# Altium PCB 24V-70A-Power-Board-v2.0.PcbDoc (part 4 of 9)
Units mm, origin at the board's own origin, x right, y up, seen from the top; angles counter-clockwise.
Board outline 350 x 215 mm, 2 copper layers (Top Layer, Bottom Layer), stack 1.64 mm thick; 337 components, 182 nets, 856 pads, 561 vias.
Unrouted connection lines stored in the file: 58.
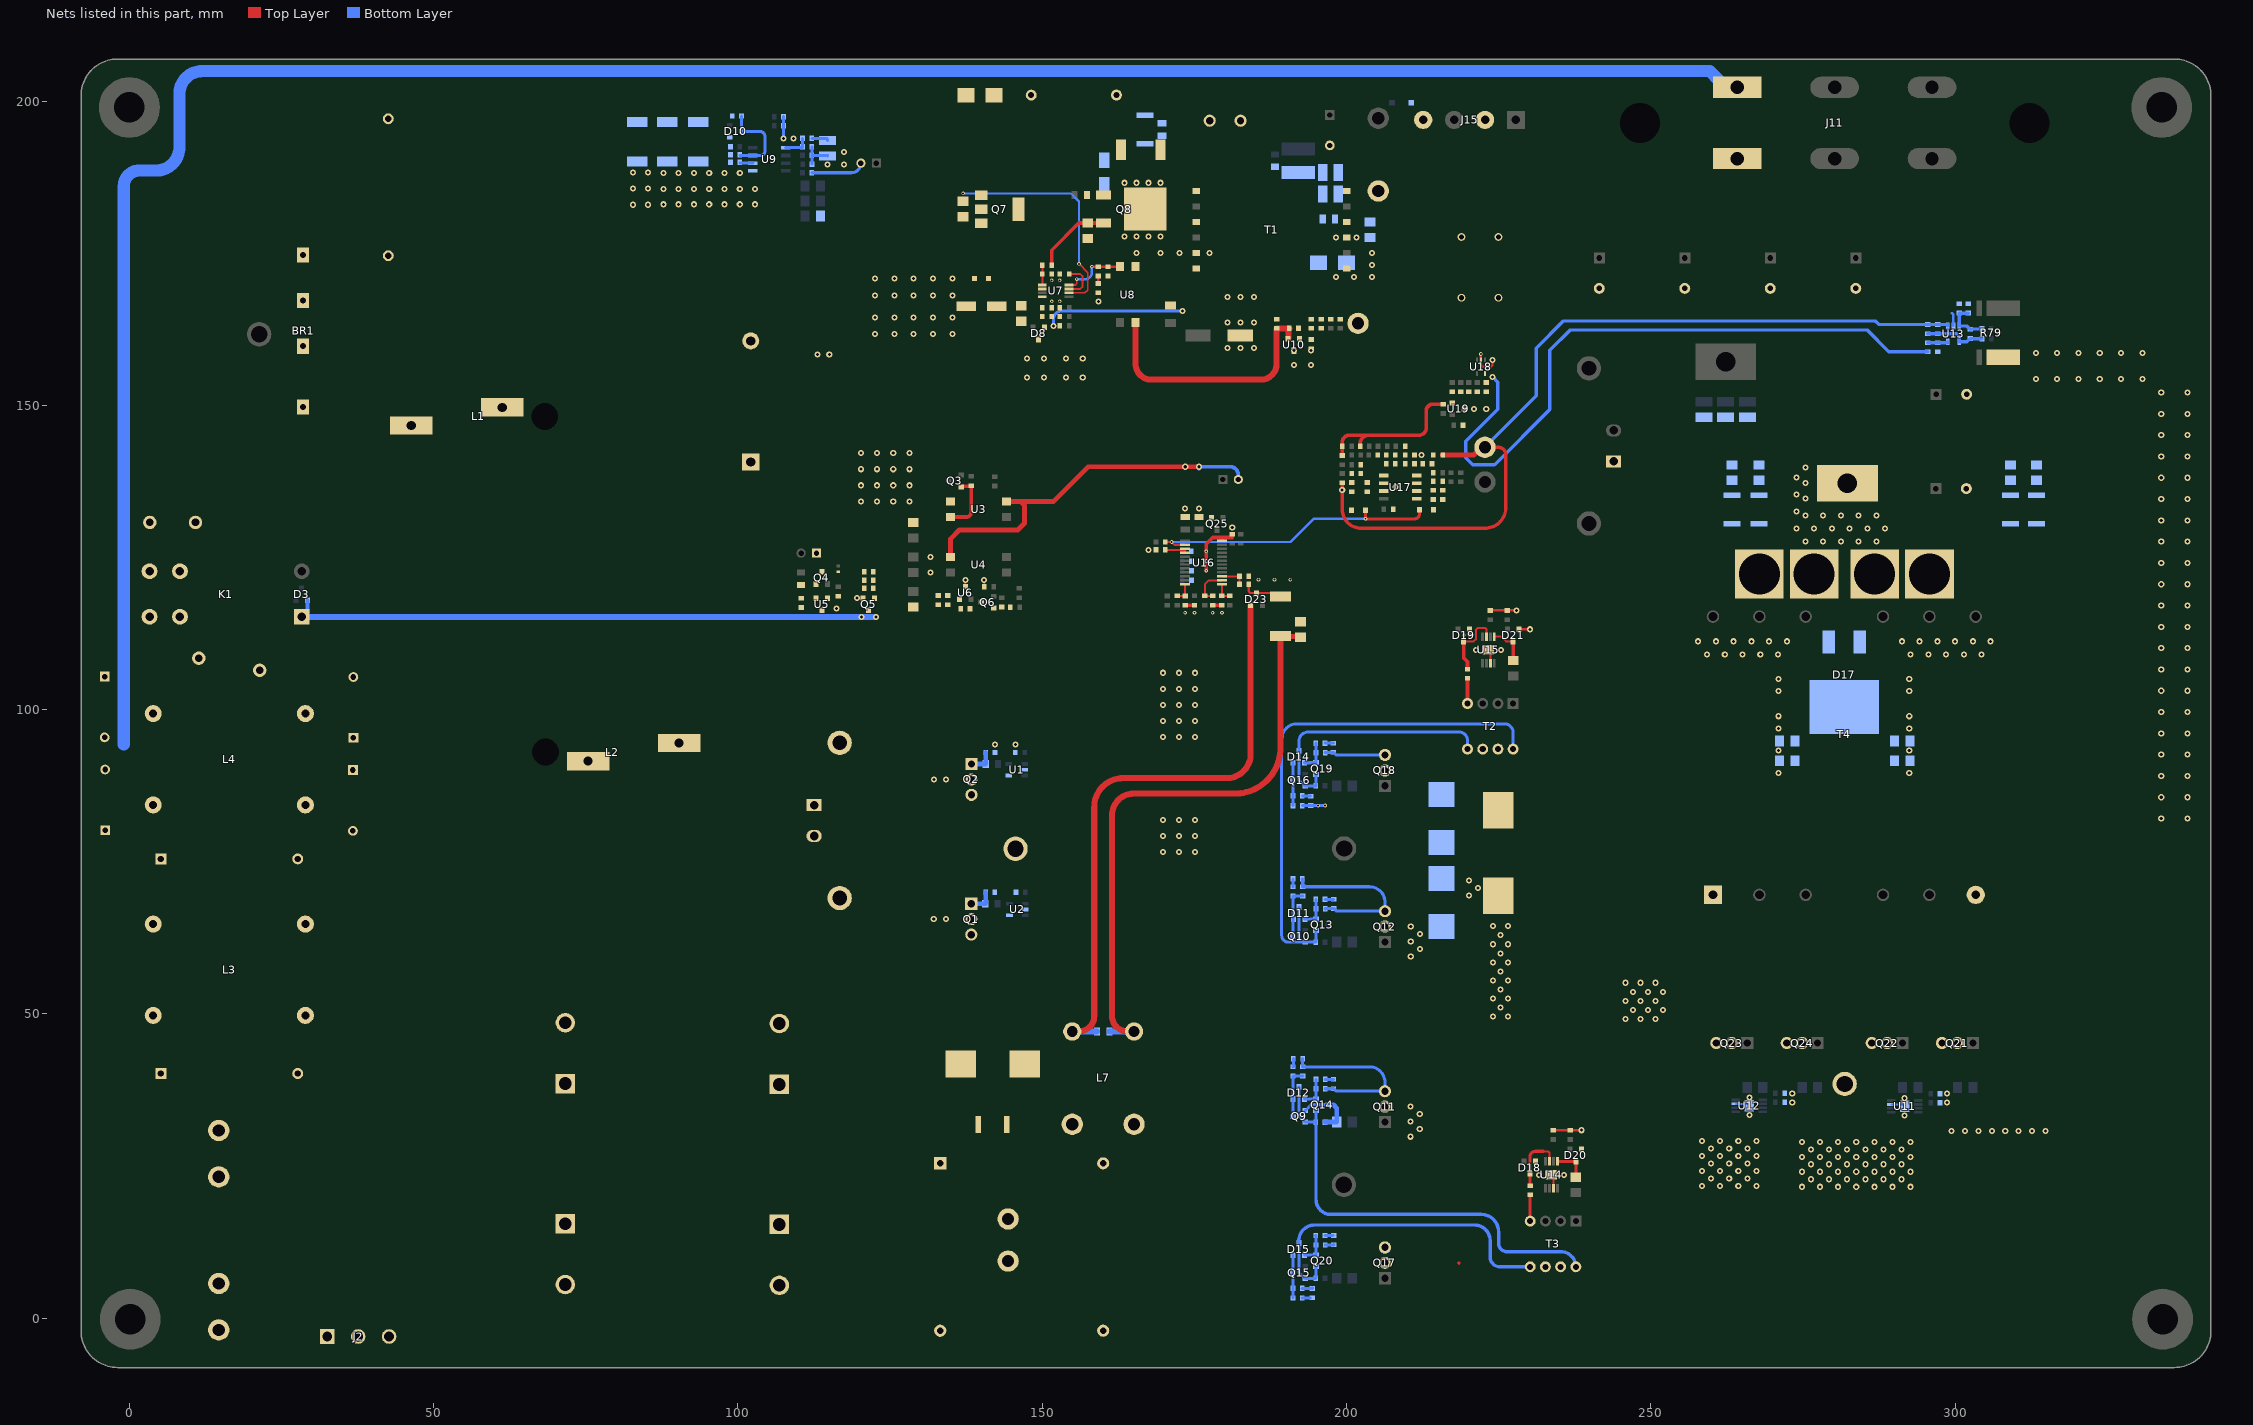
[diagram p2: the nets of this part, all layers, seen from the top]

## Part data (continued)
NT1: "Net Tie SMD", Manufacturer Part Number="Net Tie", Item Type="Net Tie Pad"
Q1 Q2: "MOSFET N-CH 650V 18A TO220-3", Manufacturer=Infineon, ComponentLink1Description=http://www.farnell.com/datasheets/1812585.pdf?src-supplier=Element14, ComponentLink1URL=http://www.farnell.com/datasheets/1812585.pdf?src-supplier=Element14, ComponentLink2Description=http://www.farnell.com/datasheets/1812585.pdf?src-supplier=Newark, ComponentLink2URL=http://www.farnell.com/datasheets/1812585.pdf?src-supplier=Newark, Item Type=Mosfet, Manufacturer Part Number=IPP65R125C7, Pricing="1=4.05, 10=3.4, 50=2.58, 100=2.35, 1000=1.88, 10000=1.88 (USD)", RoHS=Yes, Supplier=Mouser
Q3: "MOSFET P-CH 40V 2.3A SOT23-3", Drain to Source Breakdown Voltage=-40V, LCSC Part Number=C727531, Manufacturer="Vishay Siliconix", ComponentLink1Description=https://datasheet.ciiva.com/28599/1749956-28599616.pdf?src-supplier=Element14, ComponentLink1URL=https://datasheet.ciiva.com/28599/1749956-28599616.pdf?src-supplier=Element14, ComponentLink2Description=https://datasheet.ciiva.com/16486/72315-16486091.pdf?src-supplier=Future+Electronics, ComponentLink2URL=https://datasheet.ciiva.com/16486/72315-16486091.pdf?src-supplier=Future+Electronics, ComponentLink3Description=https://datasheet.ciiva.com/7788/72315-7788760.pdf?src-supplier=Element14, ComponentLink3URL=https://datasheet.ciiva.com/7788/72315-7788760.pdf?src-supplier=Element14, ComponentLink4Description=https://datasheet.ciiva.com/932/72315-932453.pdf?src-supplier=Digikey, ComponentLink4URL=https://datasheet.ciiva.com/932/72315-932453.pdf?src-supplier=Digikey, ComponentLink5Description=https://datasheet.ciiva.com/932/72315-932454.pdf?src-supplier=Digikey, ComponentLink5URL=https://datasheet.ciiva.com/932/72315-932454.pdf?src-supplier=Digikey, ComponentLink6Description=https://datasheet.ciiva.com/932/72315-932455.pdf?src-supplier=Digikey, ComponentLink6URL=https://datasheet.ciiva.com/932/72315-932455.pdf?src-supplier=Digikey, ComponentLink7Description=https://datasheet.ciiva.com/11161/72315-11161455.pdf?src-supplier=Avnet, ComponentLink7URL=https://datasheet.ciiva.com/11161/72315-11161455.pdf?src-supplier=Avnet, Item Type=MOSFETs, Lead Free=5697LeadFree, Manufacturer Part Number=SI2319DS-T1-E3, Pricing="1=0.55, 10=0.466, 50=0.466, 100=0.359, 1000=0.296, 10000=0.237 (USD)", RoHS=Yes, Stock=200176, Supplier=Mouser
Q4: "MOSFET P-CH 60V 1.6A SOT23-3", Case/Package=SOT-23-3, Continuous Drain Current (ID)=1.2A, Drain to Source Resistance=345mR, Drain to Source Voltage (Vdss)=60V, Gate to Source Voltage (Vgs)=20V, Input Capacitance=210pF, LCSC Part Number=C553975, Manufacturer="Vishay Siliconix", Max Operating Temperature=150°C, Max Power Dissipation=1.7W, Min Operating Temperature=-55°C, Package Quantity=3000, Power Dissipation=1W, Threshold Voltage=-1V, ComponentLink1Description=https://datasheet.ciiva.com/16217/si2309cd-16217597.pdf?src-supplier=Future+Electronics, ComponentLink1URL=https://datasheet.ciiva.com/16217/si2309cd-16217597.pdf?src-supplier=Future+Electronics, ComponentLink2Description=https://datasheet.ciiva.com/29742/si2309cd-29742879.pdf?src-supplier=Digikey, ComponentLink2URL=https://datasheet.ciiva.com/29742/si2309cd-29742879.pdf?src-supplier=Digikey, Drain-source On Resistance-Max=345mR, Fall Time=35ns, Height=1.02mm, Item Type=MOSFETs, Lead Free="Lead Free", Length=3.04mm, Manufacturer Part Number=SI2309CDS-T1-E3, Mounting Technology="Surface Mount", Number of Channels=1, Packaging="Tape and Reel", Pins=3, Polarity=P-CHANNEL, Pricing="1=0.53, 10=0.453, 50=0.453, 100=0.316, 1000=0.2, 10000=0.157 (USD)", Radiation Hardening=No, Rds On Max=345mR, Rise Time=35ns, RoHS=Yes, RoHS Compliant=Yes, Series=TrenchFET®, Stock=57582, Supplier=Mouser, Turn-Off Delay Time=15ns, Turn-On Delay Time=40ns, Weight=0.050717oz, Width=1.4mm
Q5 Q25: "50V 220mA 3.5Ω@10V,220mA 225mW 1.6V@1mA N Channel SOT-23 MOSFETs ROHS", LCSC Part Number=C426569, Manufacturer="Slkor(SLKORMICRO Elec.)", Package=SOT-23, ComponentLink1Description=LCSC, ComponentLink1URL=https://www.lcsc.com/product-detail/MOSFETs_Slkor-SLKORMICRO-Elec-BSS138_C426569.html, Item Type=Mosfet, Manufacturer Part Number=BSS138
Q6: "40V 300mW 200mA PNP SOT-23(TO-236) Bipolar Transistors - BJT ROHS", LCSC Part Number=C2891809, Manufacturer=YONGYUTAI, Package=SOT-23(TO-236), ComponentLink1Description=LCSC, ComponentLink1URL=https://www.lcsc.com/product-detail/Bipolar-Transistors-BJT_YONGYUTAI-MMBT3906_C2891809.html, Item Type=Transistor, Manufacturer Part Number=MMBT3906
Q7: "Trans MOSFET N-CH 600V 0.12A Automotive 4-Pin(3+Tab) SOT-223", LCSC Part Number=C3278599, Manufacturer=Infineon, Item Type=MOSFETs, Manufacturer Part Number=BSP135H6327XTSA1, Pricing="1=1.31, 10=1.08, 50=1.08, 100=0.837, 1000=0.577, 10000=0.563 (USD)", RoHS=Yes, Stock=85947, Supplier=Mouser
Q8: "650V 5A 950mΩ@10V 1 N-Channel TO-252 MOSFETs ROHS", LCSC Part Number=C20755211, Manufacturer="VBsemi Elec", Package=TO-252, ComponentLink1Description=LCSC, ComponentLink1URL=https://www.lcsc.com/product-detail/MOSFETs_VBsemi-Elec-FCD4N60TM-VB_C20755211.html, Item Type=MOSFETs, Manufacturer Part Number=FCD4N60TM-VB
Q9 Q10 Q15 Q16: "40V 200mW 100 200mA NPN SOT-23 Bipolar (BJT) ROHS", LCSC Part Number=C5249683, Manufacturer=ElecSuper, Package=SOT-23, ComponentLink1Description=LCSC, ComponentLink1URL=https://www.lcsc.com/product-detail/Bipolar-BJT_ElecSuper-MMBT3904_C5249683.html, Item Type=(BJT), Manufacturer Part Number=MMBT3904
Q11 Q12 Q17 Q18: "MOSFET N-CH 650V 14A TO220-3", LCSC Part Number=726-IPP65R190CFD, Manufacturer=Infineon, Max Dual Supply Voltage=650V, On-State Resistance=190mR, ComponentLink1Description=https://datasheet.ciiva.com/952/infineon-ipx65r190cfd-ds-v02-07-en-952136.pdf?src-supplier=Digikey, ComponentLink1URL=https://datasheet.ciiva.com/952/infineon-ipx65r190cfd-ds-v02-07-en-952136.pdf?src-supplier=Digikey, Item Type=MOSFETs, Lead Free=5697LeadFree, Manufacturer Part Number=IPP65R190CFDXKSA1, Pricing="1=3.7, 10=3.11, 50=2.93, 100=2.51, 1000=1.91, 10000=1.8 (USD)", RoHS=Yes, Stock=410, Supplier=Mouser
Q13 Q14 Q19 Q20: "TRANS PNP 40V 0.2A SOT23-3", Current Rating=-200mA, LCSC Part Number=C82762, Manufacturer="Diodes Zetex", Voltage Rating (DC)=-40V, ComponentLink1Description=https://datasheet.ciiva.com/27052/1540746-27052408.pdf?src-supplier=Jameco, ComponentLink1URL=https://datasheet.ciiva.com/27052/1540746-27052408.pdf?src-supplier=Jameco, ComponentLink2Description=https://datasheet.ciiva.com/15139/getdatasheetpartid-255292-15139821.pdf?src-supplier=Verical, ComponentLink2URL=https://datasheet.ciiva.com/15139/getdatasheetpartid-255292-15139821.pdf?src-supplier=Verical, Item Type=BJTs, Lead Free=5697LeadFree, Manufacturer Part Number=MMBT3906-7-F, Pricing="3000=0.0143, 12000=0.0137, 30000=0.0112, 45000=0.0131, 75000=0.0109, 120000=0.0128, 300000=0.0121 (USD)", RoHS=Yes, Stock=567000, Supplier="Future Electronics"
Q21 Q22 Q23 Q24: "MOSFET N-CH 200V 84A TO220-3", Case/Package=TO-220-3, LCSC Part Number=C537163, Manufacturer=Infineon, ComponentLink1Description=http://www.farnell.com/datasheets/1932551.pdf?src-supplier=Element14, ComponentLink1URL=http://www.farnell.com/datasheets/1932551.pdf?src-supplier=Element14, Halogen Free="Halogen Free", Item Type=MOSFETs, Lead Free="Lead Free", Manufacturer Part Number=IPP120N20NFD, Packaging=Rail/Tube, Pins=3, Pricing="50=2.03, 1000=2, 1500=1.98, 2000=1.97, 2500=1.93 (USD)", Reach SVHC Compliant=Yes, RoHS=Yes, RoHS Compliant=Yes, Stock=2450, Supplier="Future Electronics"
R1 R2 R29 R41: library part CRCW08052R21FKEA, "RES SMD 2.21 OHM 1% 1/8W 0805", LCSC Part Number=C2085884, Manufacturer="Vishay Dale", Voltage Rating (DC)=150V, ComponentLink1Description=https://datasheet.ciiva.com/9090/dcrcwe3-9090039.pdf?src-supplier=Avnet, ComponentLink1URL=https://datasheet.ciiva.com/9090/dcrcwe3-9090039.pdf?src-supplier=Avnet, ComponentLink2Description=https://datasheet.ciiva.com/5588/dcrcwe3-109170-5588315.pdf?src-supplier=Mouser, ComponentLink2URL=https://datasheet.ciiva.com/5588/dcrcwe3-109170-5588315.pdf?src-supplier=Mouser, ComponentLink3Description=https://datasheet.ciiva.com/2467/dcrcwe3-2467362.pdf?src-supplier=Digikey, ComponentLink3URL=https://datasheet.ciiva.com/2467/dcrcwe3-2467362.pdf?src-supplier=Digikey, ComponentLink4Description=https://datasheet.ciiva.com/2467/dcrcwe3-2467363.pdf?src-supplier=Digikey, ComponentLink4URL=https://datasheet.ciiva.com/2467/dcrcwe3-2467363.pdf?src-supplier=Digikey, ComponentLink5Description=https://datasheet.ciiva.com/2467/dcrcwe3-2467364.pdf?src-supplier=Digikey, ComponentLink5URL=https://datasheet.ciiva.com/2467/dcrcwe3-2467364.pdf?src-supplier=Digikey, Item Type=Resistor, Lead Free=5697LeadFree, Manufacturer Part Number=CRCW08052R21FKEA, Pricing="1=0.1, 10=0.033, 50=0.033, 100=0.02, 1000=0.015, 10000=0.01 (USD)", RoHS=Yes, Stock=740, Supplier=Mouser
R3 R4 R8 R13 R17 R38 R47 R86 R114 R119: library part RK73G1JTTD1002F, "RES 10K OHM 1% 1/10W 0603", Case Code (Imperial)=0603, Case Code (Metric)=1608, LCSC Part Number=C362180, Max Operating Temperature=125°C, Min Operating Temperature=-55°C, Power Rating=100mW, Supplier Part Number=2019-RK73G1JTTD1002FCT-ND, Temperature Coefficient=50ppm/°C, Tolerance=1%, Voltage Rating=75V, Case/Package=0603, Category="Chip SMD Resistors", ComponentLink1Description=LCSC, ComponentLink2Description=http://www.mouser.com/ds/2/219/RK73G-9863.pdf?src-supplier=Mouser, ComponentLink2URL=http://www.mouser.com/ds/2/219/RK73G-9863.pdf?src-supplier=Mouser, Construction=Rectangular, Depth=0.8mm, Item Type=Resistor, Length=1.6mm, Military Standard=Not, Packaging="Tape and Reel", Pricing="1=0.22, 10=0.118, 50=0.0812, 100=0.0699, 500=0.0513, 1000=0.04545 (USD)", RoHS=Yes, RoHS Compliant=Yes, Series=RK73G, Stock=249394, Supplier=Digi-Key, Termination=SMD/SMT
R5 R6 R7: library part PA2512FKE7W0R03E, "RES 0.03 OHM 1% 2W 2512", LCSC Part Number=C728311, Manufacturer=Yageo, Item Type=Resistor, Manufacturer Part Number=PA2512FKE7W0R03E, Pricing="1=0.655, 25=0.542, 50=0.453, 100=0.364, 250=0.314 (USD)", RoHS=No, Stock=4000, Supplier=Avnet
R9 R117: library part CRCW060347K5FKEA, "RES SMD 47.5K OHM 1% 1/10W 0603", Case Code (Imperial)=0603, Case Code (Metric)=1608, LCSC Part Number=C844568, Manufacturer=Vishay, Max Operating Temperature=155°C, Max Power Dissipation=100mW, Min Operating Temperature=-55°C, Package Quantity=10, Resistance Tolerance=1%, Resistor Type="Thick Film", Temperature Coefficient=100ppm/°C, Voltage Rating=75V, Case/Package=0603, ComponentLink1Description=https://datasheet.ciiva.com/11810/0900766b80d98afc-11810543.pdf?src-supplier=Rs, ComponentLink1URL=https://datasheet.ciiva.com/11810/0900766b80d98afc-11810543.pdf?src-supplier=Rs, ComponentLink2Description=https://datasheet.ciiva.com/7841/1697337-7841832.pdf?src-supplier=Element14, ComponentLink2URL=https://datasheet.ciiva.com/7841/1697337-7841832.pdf?src-supplier=Element14, ComponentLink3Description=https://datasheet.ciiva.com/7841/125364-7841833.pdf?src-supplier=Element14, ComponentLink3URL=https://datasheet.ciiva.com/7841/125364-7841833.pdf?src-supplier=Element14, ComponentLink4Description=https://datasheet.ciiva.com/2465/dcrcwe3-2465817.pdf?src-supplier=Digikey, ComponentLink4URL=https://datasheet.ciiva.com/2465/dcrcwe3-2465817.pdf?src-supplier=Digikey, ComponentLink5Description=https://datasheet.ciiva.com/2465/dcrcwe3-2465818.pdf?src-supplier=Digikey, ComponentLink5URL=https://datasheet.ciiva.com/2465/dcrcwe3-2465818.pdf?src-supplier=Digikey, ComponentLink6Description=https://datasheet.ciiva.com/2465/dcrcwe3-2465816.pdf?src-supplier=Digikey, ComponentLink6URL=https://datasheet.ciiva.com/2465/dcrcwe3-2465816.pdf?src-supplier=Digikey, ComponentLink7Description=https://datasheet.ciiva.com/16769/70201119-16769373.pdf?src-supplier=Allied+Electronics, ComponentLink7URL=https://datasheet.ciiva.com/16769/70201119-16769373.pdf?src-supplier=Allied+Electronics, Construction=Rectangular, Contact Plating=Tin, Depth=0.85mm, Features="Automotive AEC-Q200", Height=0.45mm, Item Type=Resistors, Length=1.55mm, Manufacturer Part Number=CRCW060347K5FKEA, Military Standard=Not, Number of Terminations=2, Packaging="Tape and Reel", Power Rating=100mW, Pricing="1=0.1, 10=0.016, 50=0.016, 100=0.01, 1000=0.009, 10000=0.004 (USD)", Radiation Hardening=No, Reach SVHC Compliant=Unknown, RoHS=Yes, RoHS Compliant=Yes, Series=CRCW, Stock=130545, Supplier=Mouser, Technology="THICK FILM", Termination=SMD/SMT, Tolerance=1%, Voltage Rating (DC)=75V, Weight=7.1E-05oz, Width=0.033inch
R10 R87 R88: library part CRCW06038K25FKEA, "RES SMD 8.25K OHM 1% 1/10W 0603", LCSC Part Number=C843969, Manufacturer=Vishay, Voltage Rating (DC)=75V, ComponentLink1Description=https://datasheet.ciiva.com/11810/0900766b80d98afc-11810884.pdf?src-supplier=Rs, ComponentLink1URL=https://datasheet.ciiva.com/11810/0900766b80d98afc-11810884.pdf?src-supplier=Rs, ComponentLink2Description=https://datasheet.ciiva.com/5550/dcrcwe3-109170-5550394.pdf?src-supplier=Mouser, ComponentLink2URL=https://datasheet.ciiva.com/5550/dcrcwe3-109170-5550394.pdf?src-supplier=Mouser, ComponentLink3Description=https://datasheet.ciiva.com/16762/70201119-16762982.pdf?src-supplier=Allied+Electronics, ComponentLink3URL=https://datasheet.ciiva.com/16762/70201119-16762982.pdf?src-supplier=Allied+Electronics, ComponentLink4Description=https://datasheet.ciiva.com/22869/70201119-22869848.pdf?src-supplier=Allied+Electronics, ComponentLink4URL=https://datasheet.ciiva.com/22869/70201119-22869848.pdf?src-supplier=Allied+Electronics, ComponentLink5Description=https://datasheet.ciiva.com/7679/1697337-7679147.pdf?src-supplier=Element14, ComponentLink5URL=https://datasheet.ciiva.com/7679/1697337-7679147.pdf?src-supplier=Element14, ComponentLink6Description=https://datasheet.ciiva.com/16427/dcrcwe3-16427340.pdf?src-supplier=Future+Electronics, ComponentLink6URL=https://datasheet.ciiva.com/16427/dcrcwe3-16427340.pdf?src-supplier=Future+Electronics, ComponentLink7Description=https://datasheet.ciiva.com/2494/dcrcwe3-2494900.pdf?src-supplier=Digikey, ComponentLink7URL=https://datasheet.ciiva.com/2494/dcrcwe3-2494900.pdf?src-supplier=Digikey, ComponentLink8Description=https://datasheet.ciiva.com/2494/dcrcwe3-2494901.pdf?src-supplier=Digikey, ComponentLink8URL=https://datasheet.ciiva.com/2494/dcrcwe3-2494901.pdf?src-supplier=Digikey, ComponentLink9Description=https://datasheet.ciiva.com/2494/dcrcwe3-2494902.pdf?src-supplier=Digikey, ComponentLink9URL=https://datasheet.ciiva.com/2494/dcrcwe3-2494902.pdf?src-supplier=Digikey, Item Type=Resistors, Lead Free=5697LeadFree, Manufacturer Part Number=CRCW06038K25FKEA, Pricing="1=0.1, 10=0.017, 50=0.017, 100=0.01, 1000=0.008, 10000=0.005 (USD)", RoHS=Yes, Stock=19942, Supplier=Mouser
R11: library part RC0603FR-0747K5L, "RES 47.5K OHM 1% 1/10W 0603", Case Code (Imperial)=0603, Case Code (Metric)=1608, LCSC Part Number=C137715, Manufacturer=Yageo, Max Operating Temperature=155°C, Max Power Dissipation=100mW, Min Operating Temperature=-55°C, Package Quantity=5000, Resistance=47.5kR, Resistance Tolerance=1%, Resistor Type="Thick Film", Temperature Coefficient=100ppm/°C, Voltage Rating=50V, Case/Package=0603, Category="Chip SMD Resistors", ComponentLink1Description=https://datasheet.ciiva.com/11808/0900766b80f96399-11808343.pdf?src-supplier=RSComponents, ComponentLink1URL=https://datasheet.ciiva.com/11808/0900766b80f96399-11808343.pdf?src-supplier=RSComponents, ComponentLink2Description=https://datasheet.ciiva.com/2454/pyu-r-int-thick-7-2454790.pdf?src-supplier=Digi-Key, ComponentLink2URL=https://datasheet.ciiva.com/2454/pyu-r-int-thick-7-2454790.pdf?src-supplier=Digi-Key, ComponentLink3Description=https://datasheet.ciiva.com/2454/pyu-r-int-thick-7-2454791.pdf?src-supplier=Digi-Key, ComponentLink3URL=https://datasheet.ciiva.com/2454/pyu-r-int-thick-7-2454791.pdf?src-supplier=Digi-Key, ComponentLink4Description=https://datasheet.ciiva.com/2454/pyu-r-int-thick-7-2454789.pdf?src-supplier=Digi-Key, ComponentLink4URL=https://datasheet.ciiva.com/2454/pyu-r-int-thick-7-2454789.pdf?src-supplier=Digi-Key, ComponentLink5Description=https://datasheet.ciiva.com/12555/rc0603-272842-12555285.pdf?src-supplier=Mouser, ComponentLink5URL=https://datasheet.ciiva.com/12555/rc0603-272842-12555285.pdf?src-supplier=Mouser, ComponentLink6Description=https://datasheet.ciiva.com/15189/getdatasheetpartid-135115-15189741.pdf?src-supplier=Verical, ComponentLink6URL=https://datasheet.ciiva.com/15189/getdatasheetpartid-135115-15189741.pdf?src-supplier=Verical, Construction=Rectangular, Depth=0.8mm, Features="Moisture Resistant", Height=0.45mm, Item Type=Resistor, Lead Free="Lead Free", Length=1.6mm, Manufacturer Part Number=RC0603FR-0747K5L, Military Standard=Not, Number of Pins=2, Number of Terminations=2, Packaging="Tape and Reel", Power Rating=100mW, Pricing 1="5000=0.00133, 10000=0.00131, 20000=0.00127 (USD)", Reach SVHC Compliant=Yes, RoHS=Yes, RoHS Compliant=Yes, Series=RC, Size Code=0603, Stock 1=20000, Supplier 1=Avnet, Supplier Part Number 1=RC0603FR-0747K5L, Technology="THICK FILM", Termination=SMD/SMT, Tolerance=1%, Voltage Rating (DC)=50V, Width=0.031inch
R12 R16 R34 R83 R85 R106 R107 R116: library part CRCW0603100KFKEA, "RES SMD 100K OHM 1% 1/10W 0603", Case Code (Imperial)=0603, Case Code (Metric)=1608, Case/Package=345Case, LCSC Part Number=C844916, Max Operating Temperature=155°C, Min Operating Temperature=-55°C, Power Rating=100mW, Resistance Tolerance=1%, Resistor Type="Thick Film", Supplier Part Number=71-CRCW0603-100K-E3, Temperature Coefficient=100ppm/°C, Voltage Rating=75V, Category="Chip SMD Resistors", ComponentLink1Description=LCSC, ComponentLink2Description=http://www.farnell.com/datasheets/2310790.pdf?src-supplier=Farnell, ComponentLink2URL=http://www.farnell.com/datasheets/2310790.pdf?src-supplier=Farnell, ComponentLink3Description=https://datasheet.octopart.com/CRCW0603100KFKEA-Vishay-datasheet-14722531.pdf?src-supplier=Newark, ComponentLink3URL=https://datasheet.octopart.com/CRCW0603100KFKEA-Vishay-datasheet-14722531.pdf?src-supplier=Newark, ComponentLink4Description=https://www.vishay.com/docs/20035/dcrcwe3.pdf?src-supplier=Digi-Key, ComponentLink4URL=https://www.vishay.com/docs/20035/dcrcwe3.pdf?src-supplier=Digi-Key, ComponentLink5Description=https://datasheet.octopart.com/CRCW0603100KFKEA-Vishay-datasheet-5300368.pdf?src-supplier=Future+Electronics, ComponentLink5URL=https://datasheet.octopart.com/CRCW0603100KFKEA-Vishay-datasheet-5300368.pdf?src-supplier=Future+Electronics, ComponentLink6Description=http://www.farnell.com/datasheets/2310790.pdf?src-supplier=Newark, ComponentLink6URL=http://www.farnell.com/datasheets/2310790.pdf?src-supplier=Newark, ComponentLink7Description=http://www.farnell.com/datasheets/2310790.pdf?src-supplier=Element14, ComponentLink7URL=http://www.farnell.com/datasheets/2310790.pdf?src-supplier=Element14, ComponentLink8Description=https://datasheet.octopart.com/CRCW0603100KFKEA-Vishay-datasheet-83961561.pdf?src-supplier=Element14, ComponentLink8URL=https://datasheet.octopart.com/CRCW0603100KFKEA-Vishay-datasheet-83961561.pdf?src-supplier=Element14, ComponentLink9Description=https://datasheet.octopart.com/CRCW0603100KFKEA-Vishay-datasheet-8363642.pdf?src-supplier=Verical, ComponentLink9URL=https://datasheet.octopart.com/CRCW0603100KFKEA-Vishay-datasheet-8363642.pdf?src-supplier=Verical, ComponentLink10Description=https://datasheet.octopart.com/CRCW0603100KFKEA-Vishay-datasheet-508714.pdf?src-supplier=Farnell, ComponentLink10URL=https://datasheet.octopart.com/CRCW0603100KFKEA-Vishay-datasheet-508714.pdf?src-supplier=Farnell, ComponentLink11Description=https://datasheet.octopart.com/CRCW0603100KFKEA-Vishay-datasheet-17834126.pdf?src-supplier=TME, ComponentLink11URL=https://datasheet.octopart.com/CRCW0603100KFKEA-Vishay-datasheet-17834126.pdf?src-supplier=TME, Features=6309FeaturesType, Height=500um, Item Type=Resistor, Lead Free=5697LeadFree, Packaging=13Packaging, Pins=2NUMBER, Pricing="1=0.1, 10=0.019, 50=0.019, 100=0.009, 1000=0.007, 10000=0.004 (USD)", RoHS=Yes, RoHS Compliant=Yes, Stock=716604, Supplier=Mouser, Tolerance=1%, Voltage Rating (DC)=75V
R14: library part RC0805FR-071ML, "RES 1M OHM 1% 1/8W 0805", Case Code (Imperial)=0805, Case Code (Metric)=2012, Case/Package=Molded, LCSC Part Number=C107700, Manufacturer=Yageo, Max Operating Temperature=155°C, Min Operating Temperature=-55°C, Power Rating=125mW, Resistance Tolerance=1%, Resistor Type="Thick Film", Supplier Part Number=7283393, Temperature Coefficient=250ppm/°C, Voltage Rating=150V, Category="Chip SMD Resistors", Construction=Rectangular, Depth=1.25mm, Item Type=Resistor, Lead Free="Lead Free", Length=2mm, Manufacturer Part Number=RC0805FR-071ML, Military Standard=Not, Packaging="Tape and Reel", Pricing="5000=0.0027, 25000=0.0025, 125000=0.0024, 500000=0.0023, 1250000=0.0021 (USD)", Reach SVHC Compliant=Unknown, RoHS=Yes, RoHS Compliant=Yes, Stock=2655000, Supplier="Future Electronics", Tolerance=1%, Voltage Rating (AC)=150V
R15 R18: library part CRCW1206715KFKEA, "RES SMD 715K OHM 1% 1/4W 1206", LCSC Part Number=C4055418, Manufacturer=Vishay, Voltage Rating (DC)=200V, ComponentLink1Description=https://datasheet.ciiva.com/5541/dcrcwe3-109170-5541198.pdf?src-supplier=Mouser, ComponentLink1URL=https://datasheet.ciiva.com/5541/dcrcwe3-109170-5541198.pdf?src-supplier=Mouser, ComponentLink2Description=https://datasheet.ciiva.com/7670/1697337-7670986.pdf?src-supplier=Element14, ComponentLink2URL=https://datasheet.ciiva.com/7670/1697337-7670986.pdf?src-supplier=Element14, ComponentLink3Description=https://datasheet.ciiva.com/7670/1697337-7670987.pdf?src-supplier=Element14, ComponentLink3URL=https://datasheet.ciiva.com/7670/1697337-7670987.pdf?src-supplier=Element14, ComponentLink4Description=https://datasheet.ciiva.com/2515/dcrcwe3-2515762.pdf?src-supplier=Digikey, ComponentLink4URL=https://datasheet.ciiva.com/2515/dcrcwe3-2515762.pdf?src-supplier=Digikey, ComponentLink5Description=https://datasheet.ciiva.com/2515/dcrcwe3-2515760.pdf?src-supplier=Digikey, ComponentLink5URL=https://datasheet.ciiva.com/2515/dcrcwe3-2515760.pdf?src-supplier=Digikey, ComponentLink6Description=https://datasheet.ciiva.com/2515/dcrcwe3-2515761.pdf?src-supplier=Digikey, ComponentLink6URL=https://datasheet.ciiva.com/2515/dcrcwe3-2515761.pdf?src-supplier=Digikey, Item Type=Resistor, Manufacturer Part Number=CRCW1206715KFKEA, Pins=2NUMBER, Pricing="1=0.1, 10=0.029, 50=0.029, 100=0.018, 1000=0.015, 10000=0.007 (USD)", RoHS=Yes, Stock=11531, Supplier=Mouser
R19: library part CRCW0603909KFKEA, "RES SMD 909K OHM 1% 1/10W 0603", LCSC Part Number=C2076687, Manufacturer=Vishay, Voltage Rating (DC)=75V, ComponentLink1Description=https://datasheet.ciiva.com/11809/0900766b80d98afc-11809763.pdf?src-supplier=Rs, ComponentLink1URL=https://datasheet.ciiva.com/11809/0900766b80d98afc-11809763.pdf?src-supplier=Rs, ComponentLink2Description=https://datasheet.ciiva.com/3257/dcrcwe3-3257961.pdf?src-supplier=Avnet, ComponentLink2URL=https://datasheet.ciiva.com/3257/dcrcwe3-3257961.pdf?src-supplier=Avnet, ComponentLink3Description=https://datasheet.ciiva.com/3257/dcrcwe3-3257962.pdf?src-supplier=Avnet, ComponentLink3URL=https://datasheet.ciiva.com/3257/dcrcwe3-3257962.pdf?src-supplier=Avnet, ComponentLink4Description=https://datasheet.ciiva.com/5547/dcrcwe3-109170-5547079.pdf?src-supplier=Mouser, ComponentLink4URL=https://datasheet.ciiva.com/5547/dcrcwe3-109170-5547079.pdf?src-supplier=Mouser, ComponentLink5Description=https://datasheet.ciiva.com/2466/dcrcwe3-2466108.pdf?src-supplier=Digikey, ComponentLink5URL=https://datasheet.ciiva.com/2466/dcrcwe3-2466108.pdf?src-supplier=Digikey, ComponentLink6Description=https://datasheet.ciiva.com/2466/dcrcwe3-2466109.pdf?src-supplier=Digikey, ComponentLink6URL=https://datasheet.ciiva.com/2466/dcrcwe3-2466109.pdf?src-supplier=Digikey, ComponentLink7Description=https://datasheet.ciiva.com/7670/1697337-7670567.pdf?src-supplier=Element14, ComponentLink7URL=https://datasheet.ciiva.com/7670/1697337-7670567.pdf?src-supplier=Element14, ComponentLink8Description=https://datasheet.ciiva.com/7670/1697337-7670566.pdf?src-supplier=Element14, ComponentLink8URL=https://datasheet.ciiva.com/7670/1697337-7670566.pdf?src-supplier=Element14, ComponentLink9Description=https://datasheet.ciiva.com/22708/1697337-22708085.pdf?src-supplier=Element14, ComponentLink9URL=https://datasheet.ciiva.com/22708/1697337-22708085.pdf?src-supplier=Element14, ComponentLink10Description=https://datasheet.ciiva.com/2466/dcrcwe3-2466107.pdf?src-supplier=Digikey, ComponentLink10URL=https://datasheet.ciiva.com/2466/dcrcwe3-2466107.pdf?src-supplier=Digikey, ComponentLink11Description=https://datasheet.ciiva.com/16397/dcrcwe3-16397319.pdf?src-supplier=Future+Electronics, ComponentLink11URL=https://datasheet.ciiva.com/16397/dcrcwe3-16397319.pdf?src-supplier=Future+Electronics, ComponentLink12Description=https://datasheet.ciiva.com/16785/70201119-16785116.pdf?src-supplier=Allied+Electronics, ComponentLink12URL=https://datasheet.ciiva.com/16785/70201119-16785116.pdf?src-supplier=Allied+Electronics, ComponentLink13Description=https://datasheet.ciiva.com/22869/70201119-22869532.pdf?src-supplier=Allied+Electronics, ComponentLink13URL=https://datasheet.ciiva.com/22869/70201119-22869532.pdf?src-supplier=Allied+Electronics, Item Type=Resistors, Lead Free=5697LeadFree, Manufacturer Part Number=CRCW0603909KFKEA, Pins=2NUMBER, Pricing="1=0.1, 10=0.017, 50=0.017, 100=0.01, 1000=0.008, 10000=0.005 (USD)", RoHS=Yes, Stock=17715, Supplier=Mouser
R20: library part CRCW1206698KFKEA, "RES SMD 698K OHM 1% 1/4W 1206", LCSC Part Number=C4220825, Manufacturer=Vishay, ComponentLink1Description=https://datasheet.ciiva.com/7670/1697337-7670984.pdf?src-supplier=Element14, ComponentLink1URL=https://datasheet.ciiva.com/7670/1697337-7670984.pdf?src-supplier=Element14, ComponentLink2Description=https://datasheet.ciiva.com/7670/1697337-7670985.pdf?src-supplier=Element14, ComponentLink2URL=https://datasheet.ciiva.com/7670/1697337-7670985.pdf?src-supplier=Element14, ComponentLink3Description=https://datasheet.ciiva.com/5545/dcrcwe3-109170-5545580.pdf?src-supplier=Mouser, ComponentLink3URL=https://datasheet.ciiva.com/5545/dcrcwe3-109170-5545580.pdf?src-supplier=Mouser, ComponentLink4Description=https://datasheet.ciiva.com/8922/dcrcwe3-8922742.pdf?src-supplier=Avnet, ComponentLink4URL=https://datasheet.ciiva.com/8922/dcrcwe3-8922742.pdf?src-supplier=Avnet, ComponentLink5Description=https://datasheet.ciiva.com/2497/dcrcwe3-2497567.pdf?src-supplier=Digikey, ComponentLink5URL=https://datasheet.ciiva.com/2497/dcrcwe3-2497567.pdf?src-supplier=Digikey, ComponentLink6Description=https://datasheet.ciiva.com/2497/dcrcwe3-2497568.pdf?src-supplier=Digikey, ComponentLink6URL=https://datasheet.ciiva.com/2497/dcrcwe3-2497568.pdf?src-supplier=Digikey, ComponentLink7Description=https://datasheet.ciiva.com/2497/dcrcwe3-2497569.pdf?src-supplier=Digikey, ComponentLink7URL=https://datasheet.ciiva.com/2497/dcrcwe3-2497569.pdf?src-supplier=Digikey, Item Type=Resistors, Manufacturer Part Number=CRCW1206698KFKEA, Pricing="1=0.1, 10=0.032, 50=0.032, 100=0.019, 1000=0.014, 10000=0.009 (USD)", RoHS=Yes, Stock=11383, Supplier=Mouser
R21: library part CRCW06036K81FKEA, "RES SMD 6.81K OHM 1% 1/10W 0603", LCSC Part Number=C2076645, Manufacturer=Vishay, Voltage Rating (DC)=75V, ComponentLink1Description=https://datasheet.ciiva.com/11810/0900766b80d98afc-11810987.pdf?src-supplier=Rs, ComponentLink1URL=https://datasheet.ciiva.com/11810/0900766b80d98afc-11810987.pdf?src-supplier=Rs, ComponentLink2Description=https://datasheet.ciiva.com/3257/dcrcwe3-3257855.pdf?src-supplier=Avnet, ComponentLink2URL=https://datasheet.ciiva.com/3257/dcrcwe3-3257855.pdf?src-supplier=Avnet, ComponentLink3Description=https://datasheet.ciiva.com/2525/dcrcwe3-2525326.pdf?src-supplier=Digikey, ComponentLink3URL=https://datasheet.ciiva.com/2525/dcrcwe3-2525326.pdf?src-supplier=Digikey, ComponentLink4Description=https://datasheet.ciiva.com/2525/dcrcwe3-2525327.pdf?src-supplier=Digikey, ComponentLink4URL=https://datasheet.ciiva.com/2525/dcrcwe3-2525327.pdf?src-supplier=Digikey, ComponentLink5Description=https://datasheet.ciiva.com/2525/dcrcwe3-2525328.pdf?src-supplier=Digikey, ComponentLink5URL=https://datasheet.ciiva.com/2525/dcrcwe3-2525328.pdf?src-supplier=Digikey, ComponentLink6Description=https://datasheet.ciiva.com/7673/1697337-7673318.pdf?src-supplier=Element14, ComponentLink6URL=https://datasheet.ciiva.com/7673/1697337-7673318.pdf?src-supplier=Element14, ComponentLink7Description=https://datasheet.ciiva.com/7673/1533075-7673470.pdf?src-supplier=Element14, ComponentLink7URL=https://datasheet.ciiva.com/7673/1533075-7673470.pdf?src-supplier=Element14, ComponentLink8Description=https://datasheet.ciiva.com/15159/getdatasheetpartid-67733-15159675.pdf?src-supplier=Verical, ComponentLink8URL=https://datasheet.ciiva.com/15159/getdatasheetpartid-67733-15159675.pdf?src-supplier=Verical, ComponentLink9Description=https://datasheet.ciiva.com/16758/70201119-16758917.pdf?src-supplier=Allied+Electronics, ComponentLink9URL=https://datasheet.ciiva.com/16758/70201119-16758917.pdf?src-supplier=Allied+Electronics, Item Type=Resistor, Lead Free=5697LeadFree, Manufacturer Part Number=CRCW06036K81FKEA, Pricing="1=0.1, 10=0.027, 50=0.0166, 100=0.0138, 500=0.00934, 1000=0.00802 (USD)", RoHS=Yes, Stock=6285, Supplier=Digikey
R22: library part EMC2-22RKI, "Res Metal Film 22 Ohm 10% 2W ±100ppm/C Conformal Coated AXL Ammo", Case/Package=Axial, Manufacturer="TT Welwyn", Max Operating Temperature=155°C, Max Power Dissipation=2W, Min Operating Temperature=-55°C, Package Quantity=1, Resistance Tolerance=10%, Resistor Type="Metal Film", Temperature Coefficient=100ppm/°C, Voltage Rating=500V, ComponentLink1Description=https://datasheet.ciiva.com/2717/emc-2717106.pdf?src-supplier=Digikey, ComponentLink1URL=https://datasheet.ciiva.com/2717/emc-2717106.pdf?src-supplier=Digikey, ComponentLink2Description=https://datasheet.ciiva.com/2717/emc-2717107.pdf?src-supplier=Digikey, ComponentLink2URL=https://datasheet.ciiva.com/2717/emc-2717107.pdf?src-supplier=Digikey, Item Type=Resistor, Lead Length=27mm, Length=0.394inch, Manufacturer Part Number=EMC2-22RKI, Number of Terminations=2, Packaging="Cut Tape", Power Rating=2W, Pricing="2000=0.137, 10000=0.1282, 24000=0.1271, 50000=0.1192 (USD)", Reach SVHC Compliant=No, RoHS=Yes, RoHS Compliant=Yes, Series=EMC, Stock=48000, Supplier="Arrow Electronics", Supplier Part Number=EMC2-22RKI, Tolerance=10%, Voltage Rating (DC)=500V
R23: library part CRCW251210K0FKEGHP, "RES SMD 10K OHM 1% 1.5W 2512", Case Code (Imperial)=2512, Case Code (Metric)=6432, LCSC Part Number=C2075694, Manufacturer="Vishay Dale", Max Operating Temperature=155°C, Max Power Dissipation=1.5W, Min Operating Temperature=-55°C, Package Quantity=2000, Ratings=AEC-Q200, Temperature Coefficient=100ppm/°C, Tolerance=1%, Voltage Rating=500V, Case/Package=2512, ComponentLink1Description=https://datasheet.ciiva.com/5549/crcwhpe3-46056-5549613.pdf?src-supplier=Mouser, ComponentLink1URL=https://datasheet.ciiva.com/5549/crcwhpe3-46056-5549613.pdf?src-supplier=Mouser, ComponentLink2Description=https://datasheet.ciiva.com/9051/crcwhpe3-9051373.pdf?src-supplier=Avnet, ComponentLink2URL=https://datasheet.ciiva.com/9051/crcwhpe3-9051373.pdf?src-supplier=Avnet, Contact Plating=Tin, Features="Automotive AEC-Q200", Height=0.6mm, Item Type=Resistors, Lead Free="Lead Free", Length=6.3mm, Manufacturer Part Number=CRCW251210K0FKEGHP, Number of Terminations=2, Packaging="Tape and Reel", Power Rating=1.5W, Pricing="1=0.53, 10=0.441, 50=0.441, 100=0.382, 1000=0.257, 10000=0.189 (USD)", Radiation Hardening=No, RoHS=Yes, RoHS Compliant=Yes, Series=CRCW-HP, Stock=1890, Supplier=Mouser, Weight=0.001482oz, Width=3.2mm
R24: library part CRCW2010150KFKEF, "RES SMD 150K OHM 1% 3/4W 2010", LCSC Part Number=C3008959, Manufacturer="Vishay Dale", ComponentLink1Description=https://datasheet.ciiva.com/16426/dcrcwe3-16426669.pdf?src-supplier=Future+Electronics, ComponentLink1URL=https://datasheet.ciiva.com/16426/dcrcwe3-16426669.pdf?src-supplier=Future+Electronics, ComponentLink2Description=https://datasheet.ciiva.com/5546/dcrcwe3-109170-5546910.pdf?src-supplier=Mouser, ComponentLink2URL=https://datasheet.ciiva.com/5546/dcrcwe3-109170-5546910.pdf?src-supplier=Mouser, ComponentLink3Description=https://datasheet.ciiva.com/8968/dcrcwe3-8968743.pdf?src-supplier=Avnet, ComponentLink3URL=https://datasheet.ciiva.com/8968/dcrcwe3-8968743.pdf?src-supplier=Avnet, ComponentLink4Description=https://datasheet.ciiva.com/7695/125364-7695000.pdf?src-supplier=Element14, ComponentLink4URL=https://datasheet.ciiva.com/7695/125364-7695000.pdf?src-supplier=Element14, Item Type=Resistors, Manufacturer Part Number=CRCW2010150KFKEF, Pricing="1=0.24, 10=0.093, 50=0.093, 100=0.059, 1000=0.051, 10000=0.033 (USD)", RoHS=Yes, Stock=9918, Supplier=Mouser
R25 R32: library part CRCW1206100RFKEA, "RES SMD 100 OHM 1% 1/4W 1206", Case Code (Imperial)=1206, Case Code (Metric)=3216, LCSC Part Number=C242479, Manufacturer="Vishay Dale", Max Operating Temperature=155°C, Max Power Dissipation=250mW, Min Operating Temperature=-55°C, Package Quantity=5000, Ratings=AEC-Q200, Resistance Tolerance=1%, Resistor Type="Thick Film", Temperature Coefficient=100ppm/°C, Voltage Rating=200V, Case/Package=1206, Construction=Rectangular, Contact Plating=Tin, Depth=1.6mm, Features="Automotive AEC-Q200", Height=0.55mm, Item Type=Resistors, Lead Free="Lead Free", Length=3.2mm, Manufacturer Part Number=CRCW1206100RFKEA, Military Standard=Not, Number of Terminations=2, Packaging="Tape and Reel", Pins=2, Power Rating=250mW, Pricing="1=0.1, 10=0.031, 50=0.031, 100=0.019, 1000=0.017, 10000=0.011 (USD)", Radiation Hardening=No, Reach SVHC Compliant=Unknown, RoHS=Yes, RoHS Compliant=Yes, Series=CRCW, Stock=281757, Supplier=Mouser, Termination=SMD/SMT, Tolerance=1%, Voltage Rating (DC)=200V, Weight=0.000353oz, Width=1.6mm
R26 R27 R28: library part CRCW1206332KFKEA, "RES SMD 332K OHM 1% 1/4W 1206", LCSC Part Number=C843857, Manufacturer=Vishay, Voltage Rating (DC)=200V, ComponentLink1Description=https://datasheet.ciiva.com/3882/41397335s9853079n6892-3882805.pdf?src-supplier=Arrow+Electronics, ComponentLink1URL=https://datasheet.ciiva.com/3882/41397335s9853079n6892-3882805.pdf?src-supplier=Arrow+Electronics, ComponentLink2Description=https://datasheet.ciiva.com/11811/0900766b80d98b5e-11811718.pdf?src-supplier=Rs, ComponentLink2URL=https://datasheet.ciiva.com/11811/0900766b80d98b5e-11811718.pdf?src-supplier=Rs, ComponentLink3Description=https://datasheet.ciiva.com/2497/dcrcwe3-2497030.pdf?src-supplier=Digikey, ComponentLink3URL=https://datasheet.ciiva.com/2497/dcrcwe3-2497030.pdf?src-supplier=Digikey, ComponentLink4Description=https://datasheet.ciiva.com/2497/dcrcwe3-2497031.pdf?src-supplier=Digikey, ComponentLink4URL=https://datasheet.ciiva.com/2497/dcrcwe3-2497031.pdf?src-supplier=Digikey, ComponentLink5Description=https://datasheet.ciiva.com/2497/dcrcwe3-2497032.pdf?src-supplier=Digikey, ComponentLink5URL=https://datasheet.ciiva.com/2497/dcrcwe3-2497032.pdf?src-supplier=Digikey, ComponentLink6Description=https://datasheet.ciiva.com/8944/dcrcwe3-8944746.pdf?src-supplier=Avnet, ComponentLink6URL=https://datasheet.ciiva.com/8944/dcrcwe3-8944746.pdf?src-supplier=Avnet, ComponentLink7Description=https://datasheet.ciiva.com/8944/dcrcwe3-8944761.pdf?src-supplier=Avnet, ComponentLink7URL=https://datasheet.ciiva.com/8944/dcrcwe3-8944761.pdf?src-supplier=Avnet, ComponentLink8Description=https://datasheet.ciiva.com/22675/125364-22675625.pdf?src-supplier=Element14, ComponentLink8URL=https://datasheet.ciiva.com/22675/125364-22675625.pdf?src-supplier=Element14, ComponentLink9Description=https://datasheet.ciiva.com/7673/1697337-7673398.pdf?src-supplier=Element14, ComponentLink9URL=https://datasheet.ciiva.com/7673/1697337-7673398.pdf?src-supplier=Element14, ComponentLink10Description=https://datasheet.ciiva.com/7673/1697337-7673512.pdf?src-supplier=Element14, ComponentLink10URL=https://datasheet.ciiva.com/7673/1697337-7673512.pdf?src-supplier=Element14, ComponentLink11Description=https://datasheet.ciiva.com/7673/1697337-7673513.pdf?src-supplier=Element14, ComponentLink11URL=https://datasheet.ciiva.com/7673/1697337-7673513.pdf?src-supplier=Element14, ComponentLink12Description=https://datasheet.ciiva.com/16762/70201119-16762524.pdf?src-supplier=Allied+Electronics, ComponentLink12URL=https://datasheet.ciiva.com/16762/70201119-16762524.pdf?src-supplier=Allied+Electronics, Item Type=Resistor, Lead Free=5697LeadFree, Manufacturer Part Number=CRCW1206332KFKEA, Pricing="1=0.1, 10=0.032, 50=0.032, 100=0.019, 1000=0.015, 10000=0.009 (USD)", RoHS=Yes, Stock=53634, Supplier=Mouser
R30: library part CRCW0603221RFKEA, "RES SMD 221 OHM 1% 1/10W 0603", LCSC Part Number=C844145, Manufacturer=Vishay, Voltage Rating (DC)=75V, ComponentLink1Description=https://datasheet.ciiva.com/11809/0900766b80d98afc-11809184.pdf?src-supplier=Rs, ComponentLink1URL=https://datasheet.ciiva.com/11809/0900766b80d98afc-11809184.pdf?src-supplier=Rs, ComponentLink2Description=https://datasheet.ciiva.com/3257/dcrcwe3-3257269.pdf?src-supplier=Avnet, ComponentLink2URL=https://datasheet.ciiva.com/3257/dcrcwe3-3257269.pdf?src-supplier=Avnet, ComponentLink3Description=https://datasheet.ciiva.com/3257/dcrcwe3-3257270.pdf?src-supplier=Avnet, ComponentLink3URL=https://datasheet.ciiva.com/3257/dcrcwe3-3257270.pdf?src-supplier=Avnet, ComponentLink4Description=https://datasheet.ciiva.com/2465/dcrcwe3-2465645.pdf?src-supplier=Digikey, ComponentLink4URL=https://datasheet.ciiva.com/2465/dcrcwe3-2465645.pdf?src-supplier=Digikey, ComponentLink5Description=https://datasheet.ciiva.com/2465/dcrcwe3-2465646.pdf?src-supplier=Digikey, ComponentLink5URL=https://datasheet.ciiva.com/2465/dcrcwe3-2465646.pdf?src-supplier=Digikey, ComponentLink6Description=https://datasheet.ciiva.com/2465/dcrcwe3-2465647.pdf?src-supplier=Digikey, ComponentLink6URL=https://datasheet.ciiva.com/2465/dcrcwe3-2465647.pdf?src-supplier=Digikey, ComponentLink7Description=https://datasheet.ciiva.com/7726/1697337-7726773.pdf?src-supplier=Element14, ComponentLink7URL=https://datasheet.ciiva.com/7726/1697337-7726773.pdf?src-supplier=Element14, ComponentLink8Description=https://datasheet.ciiva.com/7726/1533075-7726909.pdf?src-supplier=Element14, ComponentLink8URL=https://datasheet.ciiva.com/7726/1533075-7726909.pdf?src-supplier=Element14, ComponentLink9Description=https://datasheet.ciiva.com/16387/dcrcwe3-16387244.pdf?src-supplier=Future+Electronics, ComponentLink9URL=https://datasheet.ciiva.com/16387/dcrcwe3-16387244.pdf?src-supplier=Future+Electronics, ComponentLink10Description=https://datasheet.ciiva.com/16760/70201119-16760600.pdf?src-supplier=Allied+Electronics, ComponentLink10URL=https://datasheet.ciiva.com/16760/70201119-16760600.pdf?src-supplier=Allied+Electronics, Item Type=Resistors, Lead Free=5697LeadFree, Manufacturer Part Number=CRCW0603221RFKEA, Pricing="1=0.1, 10=0.017, 50=0.017, 100=0.01, 1000=0.008, 10000=0.005 (USD)", RoHS=Yes, Stock=61974, Supplier=Mouser
R31 R92 R112: library part RC0603FR-0749R9L, "RES 49.9 OHM 1% 1/10W 0603", Case Code (Imperial)=0603, Case Code (Metric)=1608, LCSC Part Number=C114625, Manufacturer=Yageo, Max Operating Temperature=155°C, Max Power Dissipation=100mW, Min Operating Temperature=-55°C, Resistance Tolerance=1%, Resistor Type="Thick Film", Temperature Coefficient=100ppm/°C, Voltage Rating=50V, Case/Package=0603, Category="Chip SMD Resistors", ComponentLink1Description=https://datasheet.ciiva.com/11808/0900766b80f96399-11808223.pdf?src-supplier=RSComponents, ComponentLink1URL=https://datasheet.ciiva.com/11808/0900766b80f96399-11808223.pdf?src-supplier=RSComponents, ComponentLink2Description=https://datasheet.ciiva.com/22747/443971-22747527.pdf?src-supplier=Element14, ComponentLink2URL=https://datasheet.ciiva.com/22747/443971-22747527.pdf?src-supplier=Element14, ComponentLink3Description=https://datasheet.ciiva.com/15189/getdatasheetpartid-325421-15189750.pdf?src-supplier=Verical, ComponentLink3URL=https://datasheet.ciiva.com/15189/getdatasheetpartid-325421-15189750.pdf?src-supplier=Verical, Construction=Rectangular, Depth=0.8mm, Features="Moisture Resistant", Height=0.45mm, Item Type=Resistor, Lead Free="Lead Free", Length=1.6mm, Manufacturer Part Number=RC0603FR-0749R9L, Military Standard=Not, Number of Pins=2, Number of Terminations=2, Packaging="Tape and Reel", Power Rating=100mW, Pricing 1="5000=0.00280 (USD)", REACH SVHC="No SVHC", Resistance=49.9R, RoHS=Yes, RoHS Compliant=Yes, Series=RC, Size Code=0603, Stock 1=2075000, Supplier 1="Arrow Electronics", Supplier Part Number 1=RC0603FR-0749R9L, Technology="THICK FILM", Termination=SMD/SMT, Tolerance=1%, Voltage Rating (DC)=50V
R33: library part CRCW060323K2FKEA, "RES SMD 23.2K OHM 1% 1/10W 0603", Case Code (Imperial)=0603, Case Code (Metric)=1608, LCSC Part Number=C844148, Manufacturer=Vishay, Max Operating Temperature=155°C, Max Power Dissipation=100mW, Min Operating Temperature=-55°C, Package Quantity=5000, Ratings=AEC-Q200, Resistance Tolerance=1%, Resistor Type="Thick Film", Temperature Coefficient=100ppm/°C, Voltage Rating=75V, Case/Package=0603, ComponentLink1Description=https://datasheet.ciiva.com/11810/0900766b80d98afc-11810102.pdf?src-supplier=Rs, ComponentLink1URL=https://datasheet.ciiva.com/11810/0900766b80d98afc-11810102.pdf?src-supplier=Rs, ComponentLink2Description=https://datasheet.ciiva.com/7671/1533075-7671775.pdf?src-supplier=Element14, ComponentLink2URL=https://datasheet.ciiva.com/7671/1533075-7671775.pdf?src-supplier=Element14, ComponentLink3Description=https://datasheet.ciiva.com/7671/1697337-7671609.pdf?src-supplier=Element14, ComponentLink3URL=https://datasheet.ciiva.com/7671/1697337-7671609.pdf?src-supplier=Element14, ComponentLink4Description=https://datasheet.ciiva.com/2525/dcrcwe3-2525378.pdf?src-supplier=Digikey, ComponentLink4URL=https://datasheet.ciiva.com/2525/dcrcwe3-2525378.pdf?src-supplier=Digikey, ComponentLink5Description=https://datasheet.ciiva.com/2525/dcrcwe3-2525379.pdf?src-supplier=Digikey, ComponentLink5URL=https://datasheet.ciiva.com/2525/dcrcwe3-2525379.pdf?src-supplier=Digikey, ComponentLink6Description=https://datasheet.ciiva.com/22869/70201119-22869353.pdf?src-supplier=Allied+Electronics, ComponentLink6URL=https://datasheet.ciiva.com/22869/70201119-22869353.pdf?src-supplier=Allied+Electronics, ComponentLink7Description=https://datasheet.ciiva.com/5542/dcrcwe3-109170-5542813.pdf?src-supplier=Mouser, ComponentLink7URL=https://datasheet.ciiva.com/5542/dcrcwe3-109170-5542813.pdf?src-supplier=Mouser, ComponentLink8Description=https://datasheet.ciiva.com/2525/dcrcwe3-2525377.pdf?src-supplier=Digikey, ComponentLink8URL=https://datasheet.ciiva.com/2525/dcrcwe3-2525377.pdf?src-supplier=Digikey, ComponentLink9Description=https://datasheet.ciiva.com/16775/70201119-16775386.pdf?src-supplier=Allied+Electronics, ComponentLink9URL=https://datasheet.ciiva.com/16775/70201119-16775386.pdf?src-supplier=Allied+Electronics, ComponentLink10Description=https://datasheet.ciiva.com/3257/dcrcwe3-3257292.pdf?src-supplier=Avnet, ComponentLink10URL=https://datasheet.ciiva.com/3257/dcrcwe3-3257292.pdf?src-supplier=Avnet, ComponentLink11Description=https://datasheet.ciiva.com/16430/dcrcwe3-16430088.pdf?src-supplier=Future+Electronics, ComponentLink11URL=https://datasheet.ciiva.com/16430/dcrcwe3-16430088.pdf?src-supplier=Future+Electronics, ComponentLink12Description=https://datasheet.ciiva.com/3257/dcrcwe3-3257291.pdf?src-supplier=Avnet, ComponentLink12URL=https://datasheet.ciiva.com/3257/dcrcwe3-3257291.pdf?src-supplier=Avnet, Construction=Rectangular, Contact Plating=Tin, Depth=0.85mm, Features="Automotive AEC-Q200", Height=0.45mm, Item Type=Resistors, Lead Free=5697LeadFree, Length=1.55mm, Manufacturer Part Number=CRCW060323K2FKEA, Military Standard=Not, Number of Terminations=2, Packaging="Tape and Reel", Pins=2, Power Rating=100mW, Pricing="1=0.1, 10=0.017, 50=0.017, 100=0.01, 1000=0.009, 10000=0.006 (USD)", Radiation Hardening=No, Reach SVHC Compliant=Unknown, RoHS=Yes, RoHS Compliant=Yes, Series=CRCW, Stock=8418, Supplier=Mouser, Technology="THICK FILM", Termination=SMD/SMT, Tolerance=1%, Weight=7.1E-05oz, Width=0.85mm
R35: library part CRCW120610M0JNEA, "RES SMD 10M OHM 5% 1/4W 1206", LCSC Part Number=C3008961, Manufacturer="Vishay Dale", ComponentLink1Description=https://datasheet.ciiva.com/5548/dcrcwe3-109170-5548118.pdf?src-supplier=Mouser, ComponentLink1URL=https://datasheet.ciiva.com/5548/dcrcwe3-109170-5548118.pdf?src-supplier=Mouser, ComponentLink2Description=https://datasheet.ciiva.com/16785/70201119-16785301.pdf?src-supplier=Allied+Electronics, ComponentLink2URL=https://datasheet.ciiva.com/16785/70201119-16785301.pdf?src-supplier=Allied+Electronics, ComponentLink3Description=https://datasheet.ciiva.com/28571/1747939-28571976.pdf?src-supplier=Element14, ComponentLink3URL=https://datasheet.ciiva.com/28571/1747939-28571976.pdf?src-supplier=Element14, ComponentLink4Description=https://datasheet.ciiva.com/16385/dcrcwe3-16385852.pdf?src-supplier=Future+Electronics, ComponentLink4URL=https://datasheet.ciiva.com/16385/dcrcwe3-16385852.pdf?src-supplier=Future+Electronics, ComponentLink5Description=https://datasheet.ciiva.com/2526/dcrcwe3-2526187.pdf?src-supplier=Digikey, ComponentLink5URL=https://datasheet.ciiva.com/2526/dcrcwe3-2526187.pdf?src-supplier=Digikey, ComponentLink6Description=https://datasheet.ciiva.com/2526/dcrcwe3-2526188.pdf?src-supplier=Digikey, ComponentLink6URL=https://datasheet.ciiva.com/2526/dcrcwe3-2526188.pdf?src-supplier=Digikey, ComponentLink7Description=https://datasheet.ciiva.com/2526/dcrcwe3-2526189.pdf?src-supplier=Digikey, ComponentLink7URL=https://datasheet.ciiva.com/2526/dcrcwe3-2526189.pdf?src-supplier=Digikey, ComponentLink8Description=https://datasheet.ciiva.com/9050/dcrcwe3-9050878.pdf?src-supplier=Avnet, ComponentLink8URL=https://datasheet.ciiva.com/9050/dcrcwe3-9050878.pdf?src-supplier=Avnet, Item Type=Resistors, Manufacturer Part Number=CRCW120610M0JNEA, Pricing="1=0.1, 10=0.027, 50=0.027, 100=0.017, 1000=0.013, 10000=0.007 (USD)", RoHS=Yes, Stock=11008, Supplier=Mouser
R36 R90: library part RC0603FR-0733K2L, "RES 33.2K OHM 1% 1/10W 0603", Case Code (Imperial)=0603, Case Code (Metric)=1608, LCSC Part Number=C185338, Manufacturer=Yageo, Max Operating Temperature=155°C, Max Power Dissipation=100mW, Min Operating Temperature=-55°C, Resistance=33.2kR, Resistor Type="Thick Film", Supplier Part Number 1=311-33.2KHRCT-ND, Temperature Coefficient=100ppm/°C, Tolerance=1%, Voltage Rating=50V, Case/Package=0603, Category="Chip SMD Resistors", ComponentLink1Description=https://datasheet.ciiva.com/11808/0900766b80f96399-11808316.pdf?src-supplier=RSComponents, ComponentLink1URL=https://datasheet.ciiva.com/11808/0900766b80f96399-11808316.pdf?src-supplier=RSComponents, Construction=Rectangular, Depth=0.8mm, Features="Moisture Resistant", Height=0.45mm, Lead Free="Lead Free", Length=1.6mm, Manufacturer Part Number=RC0603FR-0733K2L, Military Standard=Not, Mount="Surface Mount", Number of Terminations=2, Packaging="Tape and Reel", Power Rating=100mW, Pricing 1="1=0.10000, 10=0.02300, 100=0.00930, 1000=0.00417, 2500=0.00362 (USD)", RoHS=Yes, RoHS Compliant=Yes, Series=RC, Size Code=0603, Stock 1=1293262, Supplier 1=Digi-Key, Technology="THICK FILM", Termination=SMD/SMT, Voltage Rating (DC)=50V